# Altium PCB BOARD_2LAYER.PcbDoc (part 6 of 7)
Units mil, origin at the board's own origin, x right, y up, seen from the top; angles counter-clockwise.
Board outline 9842.52 x 9842.52 mil, 2 copper layers (Top Layer, Bottom Layer), stack 34.252 mil thick; 276 components, 129 nets, 793 pads, 303 vias.
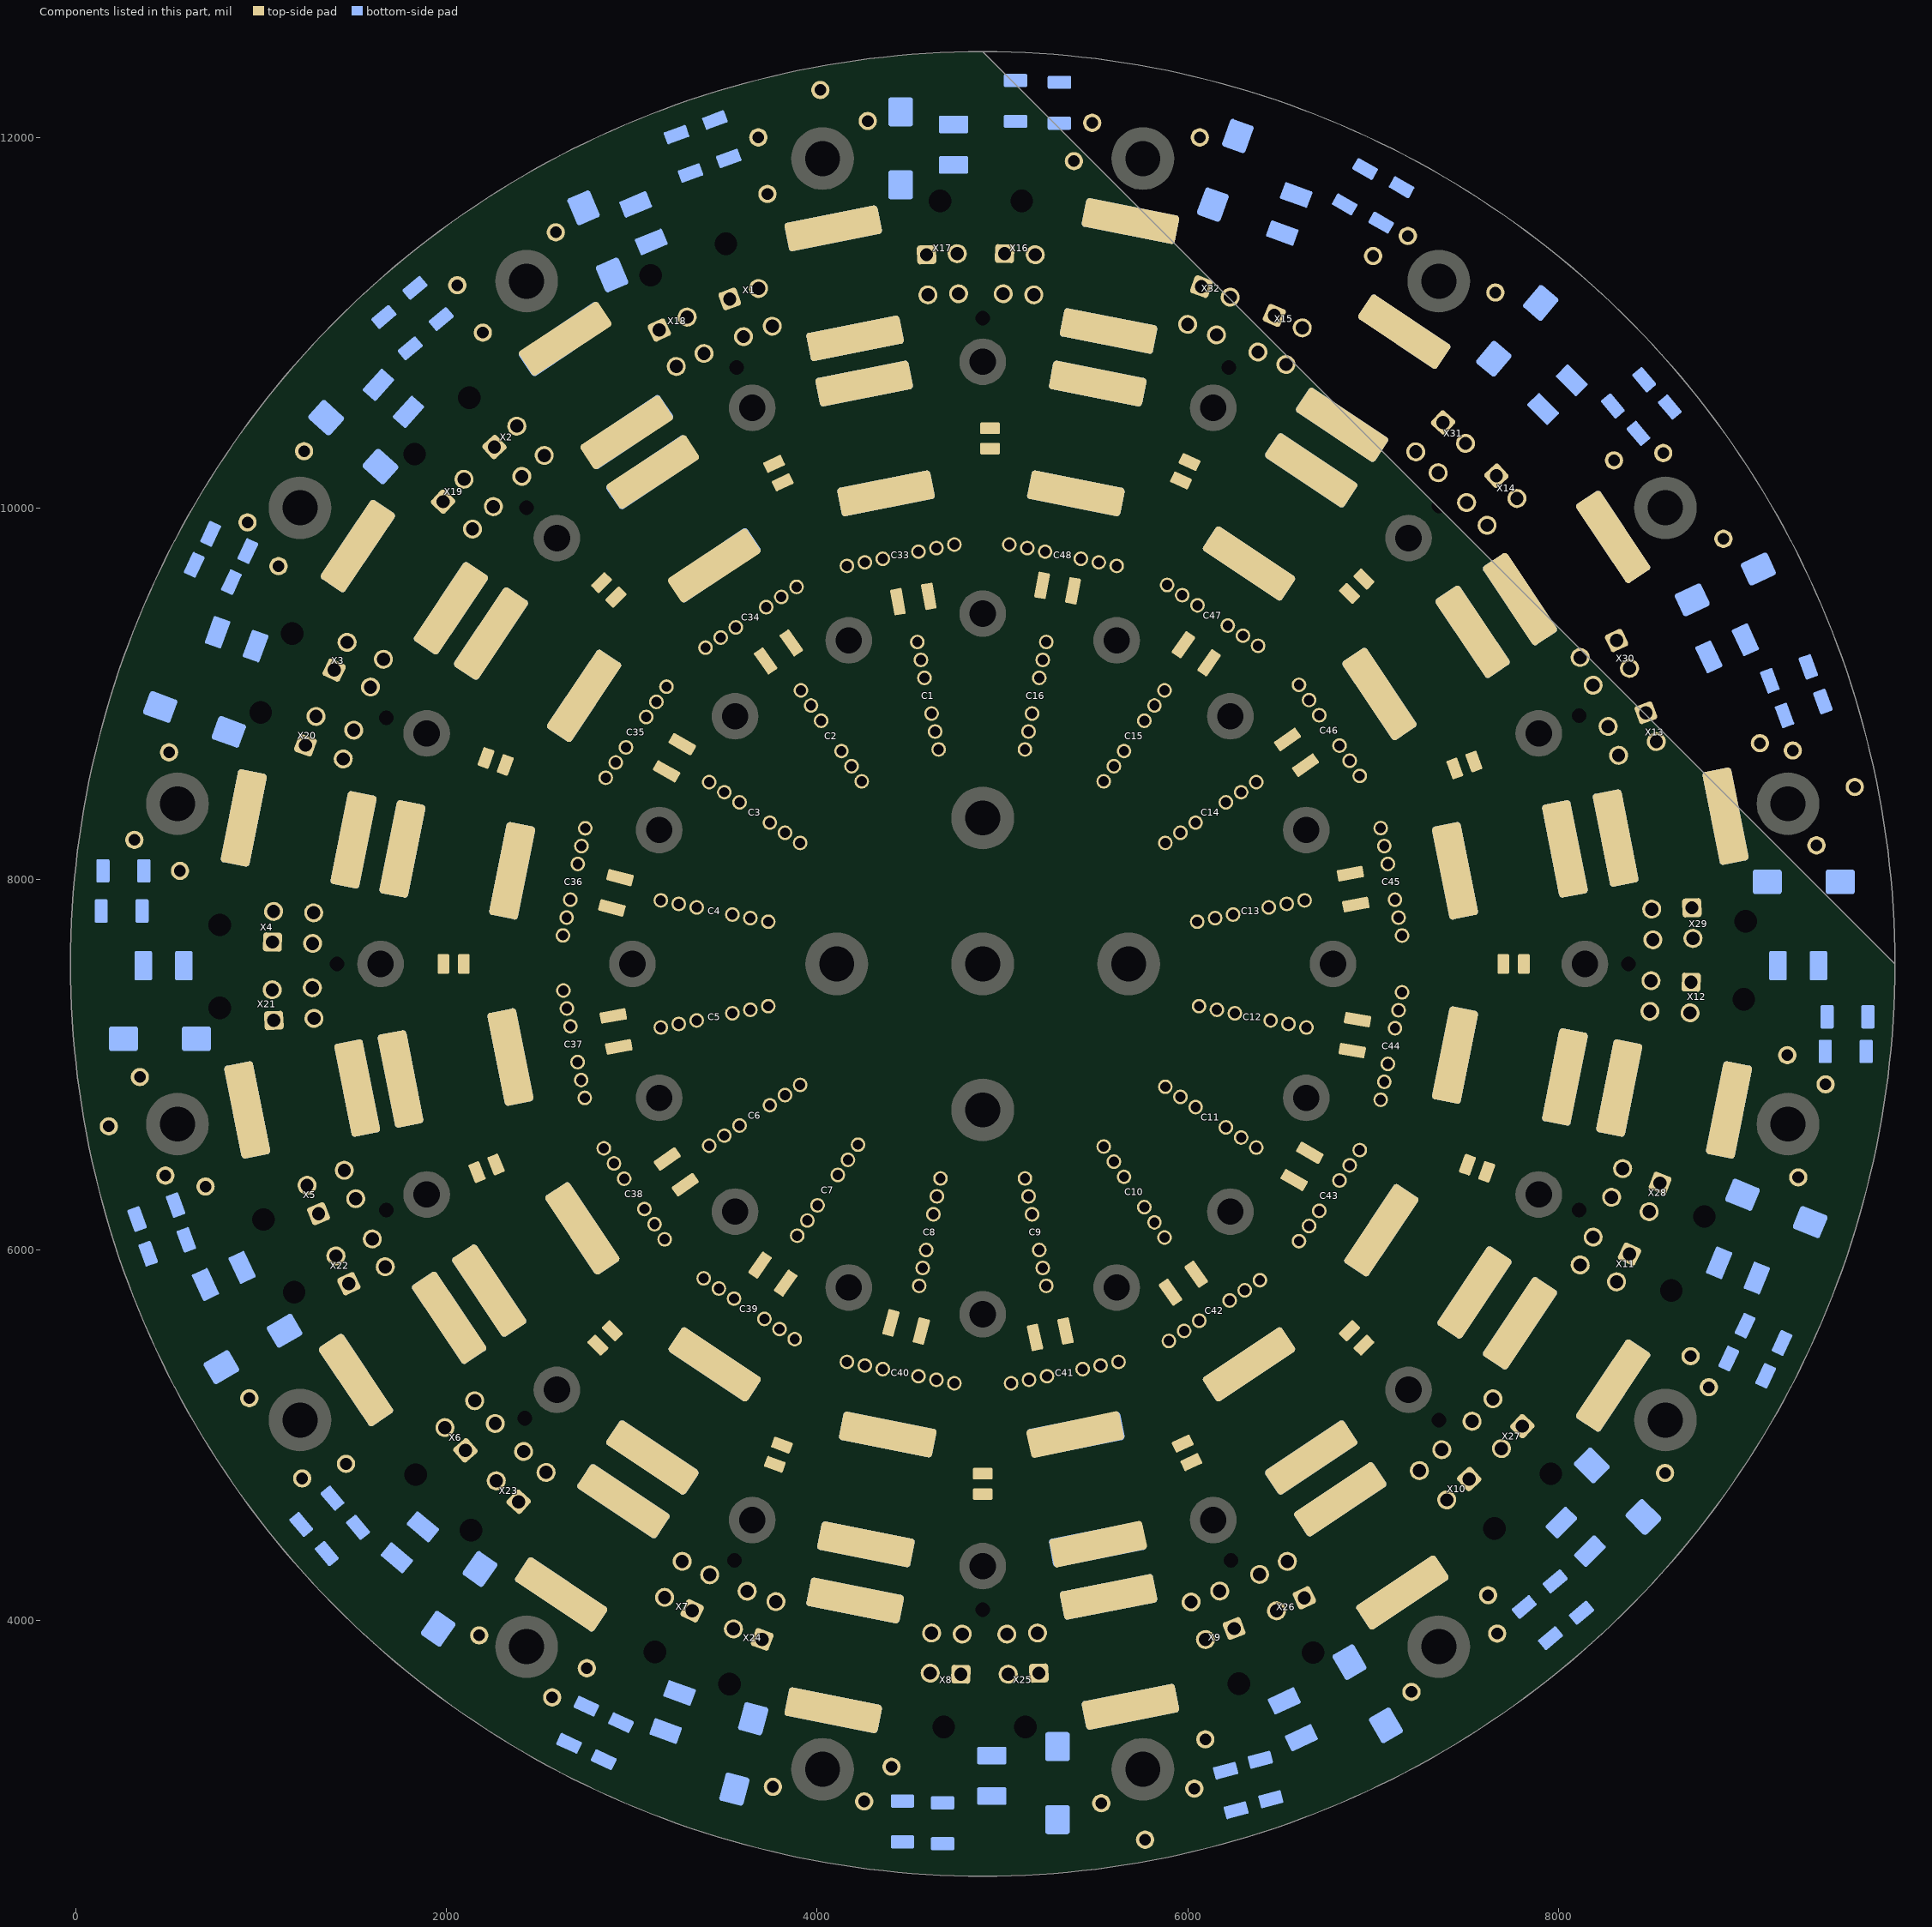
[diagram p6: the components of this part, seen from the top]

## Polygon pours and split planes (outlines as drawn) (continued)
$1N2769 on Top Layer "$1N2769_L01_P132" (solid, remove dead copper, pour order 132): 4351.23,9328.75 4413.86,9013.92 4674.26,9065.72 4611.64,9380.55
$1N5644 on Top Layer "$1N5644_L01_P128" (solid, remove dead copper, pour order 128): 5700.54,9875.58 5794.44,10347.64 5133.39,10479.14 5039.49,10007.07
$1N5613 on Top Layer "$1N5613_L01_P126" (solid, remove dead copper, pour order 126): 6530.46,9393.26 6805.29,9804.58 6245.04,10178.93 5970.21,9767.61
$1N5582 on Top Layer "$1N5582_L01_P124" (solid, remove dead copper, pour order 124): 7105.92,8639.22 7545.86,8933.18 7167.92,9498.82 6727.97,9204.85
$1N5551 on Top Layer "$1N5551_L01_P123" (solid, remove dead copper, pour order 123): 7373.14,7679.86 7902.79,7792.44 7762.81,8450.96 7233.17,8338.38
$1N5520 on Top Layer "$1N5520_L01_P121" (solid, remove dead copper, pour order 121): 7230.78,6755.51 7718.02,6658.59 7849.13,7317.74 7361.89,7414.66
$1N5489 on Top Layer "$1N5489_L01_P119" (solid, remove dead copper, pour order 119): 6739.39,5905.82 7140.31,5637.94 7513.76,6196.85 7112.84,6464.73
$1N5458 on Top Layer "$1N5458_L01_P117" (solid, remove dead copper, pour order 117): 5967.63,5318.59 6237.03,4915.41 6798.63,5290.65 6529.23,5693.84
$1N5427 on Top Layer "$1N5427_L01_P115" (solid, remove dead copper, pour order 115): 5032.48,5073.24 5138.3,4564.51 5800.8,4702.31 5694.98,5211.04
$1N5396 on Top Layer "$1N5396_L01_P113" (solid, remove dead copper, pour order 113): 4080.15,5215.65 3977.14,4697.77 4638.95,4566.13 4741.96,5084
$1N5365 on Top Layer "$1N5365_L01_P111" (solid, remove dead copper, pour order 111): 3244.82,5700.68 2959.11,5273.08 3527.94,4893 3813.65,5320.6
$1N5334 on Top Layer "$1N5334_L01_P109" (solid, remove dead copper, pour order 109): 2661.46,6473.84 2217.48,6177.18 2593.33,5614.69 3037.31,5911.34
$1N5303 on Top Layer "$1N5303_L01_P107" (solid, remove dead copper, pour order 107): 2428.46,7403.54 1907.13,7299.84 2039.44,6634.67 2560.77,6738.37
$1N5272 on Top Layer "$1N5272_L01_P105" (solid, remove dead copper, pour order 105): 2562.36,8351.15 2041.78,8454.7 1910.37,7794.04 2430.95,7690.49
$1N5241 on Top Layer "$1N5241_L01_P102" (solid, remove dead copper, pour order 102): 3047.44,9192.98 2604.82,9488.73 2230.75,8928.9 2673.37,8633.15
$1N5210 on Top Layer "$1N5210_L01_P100" (solid, remove dead copper, pour order 100): 3860,9793.26 3566.37,10241.13 2912.99,9812.76 3206.63,9364.89
$1N5645 on Top Layer "$1N5645_L01_P099" (solid, remove dead copper, pour order 99): 5779.26,10443.08 5937.96,11240.9 5340.13,11359.82 5181.44,10562
$1N5614 on Top Layer "$1N5614_L01_P098" (solid, remove dead copper, pour order 98): 6840.76,9905.6 7308.16,10605.1 6797.42,10946.37 6330.02,10246.86
$1N5583 on Top Layer "$1N5583_L01_P097" (solid, remove dead copper, pour order 97): 7577.99,9003.97 8207.64,9424.68 7871.82,9927.26 7242.18,9506.55
$1N5552 on Top Layer "$1N5552_L01_P096" (solid, remove dead copper, pour order 96): 7980.09,7841.02 8706.01,7995.31 8579.7,8589.51 7853.79,8435.21
$1N5521 on Top Layer "$1N5521_L01_P095" (solid, remove dead copper, pour order 95): 7810.04,6665.52 8602.72,6507.84 8720.58,7100.35 7927.9,7258.03
$1N5490 on Top Layer "$1N5490_L01_P094" (solid, remove dead copper, pour order 94): 7239.44,5615.33 7924.99,5157.26 8263.52,5663.91 7577.97,6121.98
$1N5459 on Top Layer "$1N5459_L01_P093" (solid, remove dead copper, pour order 93): 6309.66,4875.09 6755.98,4207.13 7260.82,4544.45 6814.5,5212.41
$1N5428 on Top Layer "$1N5428_L01_P092" (solid, remove dead copper, pour order 92): 5201.57,4489.97 5356.86,3709.27 5938.38,3824.95 5783.09,4605.64
$1N5397 on Top Layer "$1N5397_L01_P091" (solid, remove dead copper, pour order 91): 4006.93,4614.67 3844.02,3795.65 4416.85,3681.7 4579.77,4500.73
$1N5366 on Top Layer "$1N5366_L01_P090" (solid, remove dead copper, pour order 90): 2955.77,5177.05 2522.77,4529.03 3017.18,4198.67 3450.18,4846.7
$1N5335 on Top Layer "$1N5335_L01_P089" (solid, remove dead copper, pour order 89): 2180.71,6100.46 1540.3,5672.55 1873.08,5174.51 2513.49,5602.42
$1N5304 on Top Layer "$1N5304_L01_P088" (solid, remove dead copper, pour order 88): 1823.79,7233.53 1104.36,7090.43 1220.34,6507.39 1939.76,6650.5
$1N5273 on Top Layer "$1N5273_L01_P087" (solid, remove dead copper, pour order 87): 1962.39,8435.6 1223.01,8582.67 1103.65,7982.58 1843.02,7835.51
$1N5242 on Top Layer "$1N5242_L01_P086" (solid, remove dead copper, pour order 86): 2511.96,9503.02 1918.06,9899.85 1578.31,9391.37 2172.2,8994.54
$1N5211 on Top Layer "$1N5211_L01_P085" (solid, remove dead copper, pour order 85): 3434.04,10250.99 3023.75,10876.79 2523.03,10548.5 2933.32,9922.7
$1N3217 on Top Layer "$1N3217_L01_P084" (solid, remove dead copper, pour order 84): 3988.99,10497.8 3840.77,11242.93 4419.66,11358.08 4567.88,10612.95
$1N3215 on Top Layer "$1N3215_L01_P083" (solid, remove dead copper, pour order 83): 4029.2,9867.75 3931.45,10359.17 4706.85,10513.41 4804.6,10021.99
~OUT on Top Layer "~OUT_L01_P081" (solid, remove dead copper, pour order 81): 5677.91,9595.8 5369.49,9657.15 5411.57,9868.7 5719.99,9807.35
~OUT on Top Layer "~OUT_L01_P080" (solid, remove dead copper, pour order 80): 6373.7,9123.71 6114.85,9296.67 6246.22,9493.27 6505.07,9320.32
~OUT on Top Layer "~OUT_L01_P079" (solid, remove dead copper, pour order 79): 6878.01,8430.08 6705.64,8688.06 6912.25,8826.11 7084.62,8568.13
~OUT on Top Layer "~OUT_L01_P078" (solid, remove dead copper, pour order 78): 7060.96,7601.52 7001.42,7900.83 7241.75,7948.64 7301.29,7649.32
~OUT on Top Layer "~OUT_L01_P077" (solid, remove dead copper, pour order 77): 6931.57,6753.67 6993.37,7064.36 7230.69,7017.15 7168.89,6706.47
~OUT on Top Layer "~OUT_L01_P076" (solid, remove dead copper, pour order 76): 6469.82,6040.7 6641.88,6298.2 6826.71,6174.7 6654.65,5917.2
~OUT on Top Layer "~OUT_L01_P075" (solid, remove dead copper, pour order 75): 5772.35,5558.63 6032.11,5732.19 6164.08,5534.68 5904.32,5361.12
~OUT on Top Layer "~OUT_L01_P074" (solid, remove dead copper, pour order 74): 4944.47,5379.51 5247.24,5439.74 5297.23,5188.41 4994.46,5128.19
~OUT on Top Layer "~OUT_L01_P073" (solid, remove dead copper, pour order 73): 4113.01,5557.17 4419.17,5496.27 4365.33,5225.61 4059.17,5286.51
~OUT on Top Layer "~OUT_L01_P072" (solid, remove dead copper, pour order 72): 3387.22,5990.25 3650.6,5814.27 3502.24,5592.24 3238.86,5768.22
~OUT on Top Layer "~OUT_L01_P071" (solid, remove dead copper, pour order 71): 2931.28,6694.41 3105.77,6433.28 2876.91,6280.36 2702.43,6541.49
~OUT on Top Layer "~OUT_L01_P070" (solid, remove dead copper, pour order 70): 2749.02,7496.97 2808.41,7198.43 2545.35,7146.1 2485.97,7444.64
~OUT on Top Layer "~OUT_L01_P069" (solid, remove dead copper, pour order 69): 2881.98,8330.17 2817.75,8021.37 2580.65,8070.68 2644.88,8379.48
~OUT on Top Layer "~OUT_L01_P055" (solid, remove dead copper, pour order 55): 1151.51,8771.79 885.39,8824.73 726.71,8026.98 992.83,7974.04
~OUT on Top Layer "~OUT_L01_P054" (solid, remove dead copper, pour order 54): 3350.22,9021.12 3175.45,8759.57 2960.72,8903.05 3135.49,9164.6
~OUT on Top Layer "~OUT_L01_P050" (solid, remove dead copper, pour order 50): 1898.04,10136.89 1692.77,10274.05 1232.3,9584.9 1437.57,9447.74
~OUT on Top Layer "~OUT_L01_P049" (solid, remove dead copper, pour order 49): 4036.08,9504.24 3774.01,9329.13 3630.81,9543.45 3892.88,9718.56
~OUT on Top Layer "~OUT_L01_P048" (solid, remove dead copper, pour order 48): 4496.79,9875.81 4549.04,9613.13 4846.48,9672.3 4794.23,9934.98
~OUT on Top Layer "~OUT_L01_P047" (solid, remove dead copper, pour order 47): 3777.12,11331.48 3730.96,11563.51 4557.87,11727.99 4604.02,11495.96
~OUT on Top Layer "~OUT_L01_P046" (solid, remove dead copper, pour order 46): 3090.63,11082.34 2960.98,11280.09 2291.33,10841.05 2420.98,10643.3
~OUT on Top Layer "~OUT_L01_P044" (solid, remove dead copper, pour order 44): 9776.86,7543.31 ccw(c4894.97,7543.31) 4894.97,12425.2 ccw(c4894.97,7543.31) 13.08,7543.31 ccw(c4894.97,7543.31) 4894.97,2661.42 ccw(c4894.97,7543.31) 9776.86,7543.31 ccw(c4894.97,7543.31)
~OUT on Top Layer "~OUT_L01_P042" (solid, remove dead copper, pour order 42): 4889.06,8588.65 ccw(c4893,7543.31) 4494.87,8509.87 4353.31,8860.24 cw(c4893,7543.31) 4889.06,8966.53 4889.06,8588.65 ccw(c4893,7543.31)
~OUT on Top Layer "~OUT_L01_P040" (solid, remove dead copper, pour order 40): 4483.94,8505.3 ccw(c4893,7543.31) 4156.09,8284.74 3888.89,8551.94 cw(c4893,7543.31) 4342.36,8855.7 4483.94,8505.3 ccw(c4893,7543.31)
~OUT on Top Layer "~OUT_L01_P038" (solid, remove dead copper, pour order 38): 4151.29,8279.94 ccw(c4893,7543.31) 3930.82,7951.93 3582.99,8099.58 cw(c4893,7543.31) 3884.09,8547.14 4151.29,8279.94 ccw(c4893,7543.31)
~OUT on Top Layer "~OUT_L01_P036" (solid, remove dead copper, pour order 36): 3927.65,7944.38 ccw(c4893,7543.31) 3847.66,7547.24 3469.78,7547.24 cw(c4893,7543.31) 3579.81,8092.04 3927.65,7944.38 ccw(c4893,7543.31)
~OUT on Top Layer "~OUT_L01_P034" (solid, remove dead copper, pour order 34): 3924.33,7150.31 3575.21,7005.7 cw(c4893,7543.31) 3469.78,7537.4 3847.67,7537.4 ccw(c4893,7543.31)
~OUT on Top Layer "~OUT_L01_P032" (solid, remove dead copper, pour order 32): 4141.83,6816.33 3874.6,6549.11 cw(c4893,7543.31) 3577.75,6999.53 3926.86,7144.14 ccw(c4893,7543.31)
~OUT on Top Layer "~OUT_L01_P030" (solid, remove dead copper, pour order 30): 4483.08,6581.68 4338.47,6232.55 cw(c4893,7543.31) 3878.37,6545.26 4145.58,6812.47 ccw(c4893,7543.31)
~OUT on Top Layer "~OUT_L01_P028" (solid, remove dead copper, pour order 28): 4887.09,6120.09 cw(c4893,7543.31) 4344.61,6229.97 4489.22,6579.09 ccw(c4893,7543.31) 4887.09,6497.97 4887.09,6120.09 cw(c4893,7543.31)
~OUT on Top Layer "~OUT_L01_P026" (solid, remove dead copper, pour order 26): 5429.7,6225.15 cw(c4893,7543.31) 4896.94,6120.08 4896.94,6497.96 ccw(c4893,7543.31) 5288.15,6575.52 5429.7,6225.15 cw(c4893,7543.31)
~OUT on Top Layer "~OUT_L01_P024" (solid, remove dead copper, pour order 24): 5896.84,6534.4 cw(c4893,7543.31) 5440.66,6229.67 5299.09,6580.06 ccw(c4893,7543.31) 5629.63,6801.6 5896.84,6534.4 cw(c4893,7543.31)
~OUT on Top Layer "~OUT_L01_P022" (solid, remove dead copper, pour order 22): 6208.27,6999.56 cw(c4893,7543.31) 5901.63,6539.19 5634.43,6806.39 ccw(c4893,7543.31) 5860.4,7147.22 6208.27,6999.56 cw(c4893,7543.31)
~OUT on Top Layer "~OUT_L01_P020" (solid, remove dead copper, pour order 20): 6316.22,7539.37 cw(c4893,7543.31) 6211.37,7007.14 5863.48,7154.81 ccw(c4893,7543.31) 5938.34,7539.37 6316.22,7539.37 cw(c4893,7543.31)
~OUT on Top Layer "~OUT_L01_P018" (solid, remove dead copper, pour order 18): 6316.22,7549.21 5938.33,7549.21 ccw(c4893,7543.31) 5858.82,7943.25 6207.93,8087.86 cw(c4893,7543.31)
~OUT on Top Layer "~OUT_L01_P016" (solid, remove dead copper, pour order 16): 6205.36,8094.01 5856.25,7949.4 ccw(c4893,7543.31) 5623.84,8290.73 5891.05,8557.94 cw(c4893,7543.31)
~OUT on Top Layer "~OUT_L01_P014" (solid, remove dead copper, pour order 14): 5887.2,8561.71 5619.97,8294.48 ccw(c4893,7543.31) 5290.15,8510.27 5434.76,8859.39 cw(c4893,7543.31)
~OUT on Top Layer "~OUT_L01_P012" (solid, remove dead copper, pour order 12): 5428.59,8861.91 5283.98,8512.79 ccw(c4893,7543.31) 4898.91,8588.64 4898.91,8966.52 cw(c4893,7543.31)
~OUT on Top Layer "~OUT_L01_P011" (solid, remove dead copper, pour order 11): 967.22,7258.67 718.28,7209.15 878.17,6405.33 1127.11,6454.84
~OUT on Top Layer "~OUT_L01_P010" (solid, remove dead copper, pour order 10): 1349.9,5784.37 1144.8,5647.32 1607.69,4954.56 1812.79,5091.61
~OUT on Top Layer "~OUT_L01_P009" (solid, remove dead copper, pour order 9): 2271.89,4554.43 2130.1,4342.22 2841.03,3867.2 2982.82,4079.4
~OUT on Top Layer "~OUT_L01_P008" (solid, remove dead copper, pour order 8): 3634.25,3755.08 3585.01,3507.54 4378.96,3349.61 4428.2,3597.15
~OUT on Top Layer "~OUT_L01_P007" (solid, remove dead copper, pour order 7): 5177.64,3599.61 5229.84,3337.21 6001.44,3490.69 5949.25,3753.09
~OUT on Top Layer "~OUT_L01_P006" (solid, remove dead copper, pour order 6): 6657.48,4014.21 6823.24,3766.14 7513.3,4227.23 7347.54,4475.3
~OUT on Top Layer "~OUT_L01_P005" (solid, remove dead copper, pour order 5): 7881.28,4947.59 8081.1,4814.08 8544.01,5506.87 8344.19,5640.39
~OUT on Top Layer "~OUT_L01_P004" (solid, remove dead copper, pour order 4): 8655.34,6298.03 8926.98,6243.99 9085.65,7041.67 8814.01,7095.7
~OUT on Top Layer "~OUT_L01_P003" (solid, remove dead copper, pour order 3): 8852.12,7834.03 9107.55,7884.83 8946.38,8695.06 8690.95,8644.25
~OUT on Top Layer "~OUT_L01_P002" (solid, remove dead copper, pour order 2): 8409.7,9306.83 8666.36,9478.32 8182.84,10201.95 7926.19,10030.46
~OUT on Top Layer "~OUT_L01_P001" (solid, remove dead copper, pour order 1): 7501.9,10578.91 7636.48,10780.32 6952.32,11237.47 6817.74,11036.06
~OUT on Top Layer "~OUT_L01_P000" (solid, remove dead copper, pour order 0): 6133.35,11295.51 6186.49,11562.67 5374.78,11724.13 5321.63,11456.97
$1N5643 on Bottom Layer "$1N5643_L02_P225" (solid, remove dead copper, pour order 225): 5777.51,10441.06 5939.83,11257.06 5344.65,11375.45 5182.34,10559.45
$1N5612 on Bottom Layer "$1N5612_L02_P224" (solid, remove dead copper, pour order 224): 6826.84,9897.86 7262.38,10549.69 6756.19,10887.92 6320.65,10236.08
$1N5581 on Bottom Layer "$1N5581_L02_P223" (solid, remove dead copper, pour order 223): 7601.03,9005.92 8273.83,9455.47 7929.53,9970.75 7256.73,9521.2
$1N5550 on Bottom Layer "$1N5550_L02_P222" (solid, remove dead copper, pour order 222): 7959.99,7838.95 8698.26,7985.8 8577.4,8593.44 7839.12,8446.59
$1N5519 on Bottom Layer "$1N5519_L02_P221" (solid, remove dead copper, pour order 221): 7827.33,6673.77 8600.07,6520.06 8717.32,7109.51 7944.58,7263.21
$1N5488 on Bottom Layer "$1N5488_L02_P220" (solid, remove dead copper, pour order 220): 7243.29,5618.11 7945.18,5149.13 8280.69,5651.25 7578.8,6120.23
$1N5457 on Bottom Layer "$1N5457_L02_P219" (solid, remove dead copper, pour order 219): 6355.44,4827.47 6771.28,4233.59 7266.09,4580.06 6850.25,5173.94
$1N5426 on Bottom Layer "$1N5426_L02_P218" (solid, remove dead copper, pour order 218): 5187.25,4531.28 5350.61,3710.03 5938.6,3826.99 5775.24,4648.24
$1N5395 on Bottom Layer "$1N5395_L02_P217" (solid, remove dead copper, pour order 217): 4000.63,4621.42 3842.93,3828.61 4435.09,3710.82 4592.79,4503.63
$1N5364 on Bottom Layer "$1N5364_L02_P216" (solid, remove dead copper, pour order 216): 2965.58,5181.67 2517.75,4511.44 3008.03,4183.85 3455.86,4854.08
$1N5333 on Bottom Layer "$1N5333_L02_P215" (solid, remove dead copper, pour order 215): 2187.72,6094.01 1532.25,5656.04 1861.09,5163.9 2516.56,5601.87
$1N5302 on Bottom Layer "$1N5302_L02_P214" (solid, remove dead copper, pour order 214): 1835.34,7237.7 1103.72,7092.17 1219.55,6509.89 1951.16,6655.42
$1N5271 on Bottom Layer "$1N5271_L02_P213" (solid, remove dead copper, pour order 213): 1943.2,8424.12 1237.48,8564.5 1121.66,7982.21 1827.38,7841.83
$1N5240 on Bottom Layer "$1N5240_L02_P212" (solid, remove dead copper, pour order 212): 2520.67,9494.39 1915.9,9898.48 1576.45,9390.47 2181.22,8986.37
$1N5209 on Bottom Layer "$1N5209_L02_P211" (solid, remove dead copper, pour order 211): 3448.78,10245.07 3055.23,10845.33 2541.12,10508.27 2934.68,9908
D_CH-16 on Bottom Layer "D_CH-16_L02_P210" (solid, remove dead copper, pour order 210): 5975.22,11349.14 6023.73,11593.05 5207.48,11755.42 5158.96,11511.51
D_CH-15 on Bottom Layer "D_CH-15_L02_P209" (solid, remove dead copper, pour order 209): 7353.51,10620.98 7512.63,10859.12 6801.22,11334.47 6642.1,11096.33
D_CH-14 on Bottom Layer "D_CH-14_L02_P208" (solid, remove dead copper, pour order 208): 8363.48,9493.9 8535.27,9608.69 8071.77,10302.38 7899.97,10187.59
D_CH-13 on Bottom Layer "D_CH-13_L02_P207" (solid, remove dead copper, pour order 207): 8794.6,7977.09 9068.17,8031.51 8903.54,8859.17 8629.97,8804.75
D_CH-12 on Bottom Layer "D_CH-12_L02_P206" (solid, remove dead copper, pour order 206): 8685.35,6503.26 8973.44,6445.95 9132.04,7243.3 8843.95,7300.61
D_CH-11 on Bottom Layer "D_CH-11_L02_P205" (solid, remove dead copper, pour order 205): 7901.07,4940.93 8110.89,4800.73 8671.47,5639.69 8461.65,5779.89
D_CH-10 on Bottom Layer "D_CH-10_L02_P204" (solid, remove dead copper, pour order 204): 6775.19,4115.14 6951.54,3851.22 7667.41,4329.55 7491.07,4593.47
D_CH-9 on Bottom Layer "D_CH-9_L02_P203" (solid, remove dead copper, pour order 203): 5326.26,3624.75 5379.56,3356.77 6208.75,3521.71 6155.45,3789.68
D_CH-8 on Bottom Layer "D_CH-8_L02_P202" (solid, remove dead copper, pour order 202): 3786.62,3734.68 3736.01,3480.24 4574.96,3313.37 4625.57,3567.8
D_CH-7 on Bottom Layer "D_CH-7_L02_P201" (solid, remove dead copper, pour order 201): 2408.02,4441.9 2277.12,4246 2989.9,3769.74 3120.79,3965.64
D_CH-6 on Bottom Layer "D_CH-6_L02_P200" (solid, remove dead copper, pour order 200): 1428.81,5644.71 1232.73,5513.69 1705.29,4806.44 1901.38,4937.46
D_CH-5 on Bottom Layer "D_CH-5_L02_P199" (solid, remove dead copper, pour order 199): 994.34,7068.89 739.75,7018.25 897.38,6225.79 1151.96,6276.43
D_CH-4 on Bottom Layer "D_CH-4_L02_P198" (solid, remove dead copper, pour order 198): 1108.76,8631.9 866.84,8680.02 704.54,7864.11 946.47,7815.98
D_CH-3 on Bottom Layer "D_CH-3_L02_P197" (solid, remove dead copper, pour order 197): 1810.76,10007.41 1616.01,10137.54 1154.91,9447.46 1349.66,9317.33
D_CH-2 on Bottom Layer "D_CH-2_L02_P196" (solid, remove dead copper, pour order 196): 2977.02,11011.3 2860.14,11189.58 2147.98,10722.67 2264.86,10544.39
D_CH-1 on Bottom Layer "D_CH-1_L02_P195" (solid, remove dead copper, pour order 195): 3619.85,11312.37 3575.95,11533.07 4390.01,11694.99 4433.91,11474.3
$1N3213 on Bottom Layer "$1N3213_L02_P194" (solid, remove dead copper, pour order 194): 3986.72,10495.38 3839.78,11234.06 4438.74,11353.2 4585.67,10614.52
$1N6128 on Bottom Layer "$1N6128_L02_P192" (solid, remove dead copper, pour order 192): 5236.53,9565.18 4921.99,9627.74 4987.2,9955.57 5301.74,9893
$1N6128 on Bottom Layer "$1N6128_L02_P191" (solid, remove dead copper, pour order 191): 4996.58,9090.55 5067.73,9448.23 5453.87,9371.42 5382.72,9013.74
$1N6121 on Bottom Layer "$1N6121_L02_P188" (solid, remove dead copper, pour order 188): 5976.76,9292.24 5715.64,9466.72 5900.4,9743.23 6161.52,9568.76
$1N6121 on Bottom Layer "$1N6121_L02_P187" (solid, remove dead copper, pour order 187): 5581.21,8938.41 5797.52,9262.14 6124.87,9043.41 5908.56,8719.68
$1N6115 on Bottom Layer "$1N6115_L02_P184" (solid, remove dead copper, pour order 184): 6568.87,8739.57 6391.04,9005.71 6661.65,9186.53 6839.48,8920.38
$1N6115 on Bottom Layer "$1N6115_L02_P183" (solid, remove dead copper, pour order 183): 6061.4,8554.9 6380.67,8768.23 6599.4,8440.88 6280.13,8227.55
$1N6109 on Bottom Layer "$1N6109_L02_P180" (solid, remove dead copper, pour order 180): 6893.6,8007.14 6833.16,8310.99 7149.61,8373.94 7210.05,8070.09
$1N6109 on Bottom Layer "$1N6109_L02_P179" (solid, remove dead copper, pour order 179): 6355.48,8031.83 6700.6,8100.48 6777.41,7714.34 6432.29,7645.69
$1N5983 on Bottom Layer "$1N5983_L02_P176" (solid, remove dead copper, pour order 176): 6918.81,7197.82 6980.01,7505.51 7317.3,7438.42 7256.1,7130.73
$1N5983 on Bottom Layer "$1N5983_L02_P175" (solid, remove dead copper, pour order 175): 6418.79,7403.56 6861.37,7309.49 6797.2,7007.62 6354.63,7101.69
$1N5976 on Bottom Layer "$1N5976_L02_P172" (solid, remove dead copper, pour order 172): 6635.31,6453.57 6807,6710.53 7070.35,6534.56 6898.66,6277.61
$1N5976 on Bottom Layer "$1N5976_L02_P171" (solid, remove dead copper, pour order 171): 6279.6,6848.32 6582.03,6646.25 6363.3,6318.9 6060.87,6520.97
$1N5970 on Bottom Layer "$1N5970_L02_P168" (solid, remove dead copper, pour order 168): 6084.55,5871.48 6340.3,6042.36 6517.78,5776.74 6262.03,5605.86
$1N5970 on Bottom Layer "$1N5970_L02_P167" (solid, remove dead copper, pour order 167): 5905.65,6376.22 6119.86,6055.63 5792.51,5836.9 5578.3,6157.49
$1N5964 on Bottom Layer "$1N5964_L02_P164" (solid, remove dead copper, pour order 164): 5360.11,5544.15 5656.75,5603.15 5714.88,5310.92 5418.24,5251.92
$1N5964 on Bottom Layer "$1N5964_L02_P163" (solid, remove dead copper, pour order 163): 5382.93,6076.08 5459.35,5691.88 5073.22,5615.07 4996.79,5999.27
$1N5838 on Bottom Layer "$1N5838_L02_P160" (solid, remove dead copper, pour order 160): 4552.99,5519.18 4851.59,5459.78 4788.42,5142.19 4489.82,5201.59
$1N5838 on Bottom Layer "$1N5838_L02_P159" (solid, remove dead copper, pour order 159): 4787.13,5984.76 4712.59,5610 4323.81,5687.33 4398.35,6062.09
$1N5831 on Bottom Layer "$1N5831_L02_P156" (solid, remove dead copper, pour order 156): 3797.61,5809.33 4050.97,5640.04 3880.18,5384.43 3626.81,5553.72
$1N5831 on Bottom Layer "$1N5831_L02_P154" (solid, remove dead copper, pour order 154): 4183.27,6157.38 3980.87,5854.47 3740.24,6015.26 3942.64,6318.17
$1N5825 on Bottom Layer "$1N5825_L02_P152" (solid, remove dead copper, pour order 152): 3208.98,6365.2 3386.2,6099.96 3122.4,5923.7 2945.18,6188.93
$1N5825 on Bottom Layer "$1N5825_L02_P151" (solid, remove dead copper, pour order 151): 3707.02,6524.52 3417.3,6330.94 3202.81,6651.93 3492.54,6845.52
$1N5819 on Bottom Layer "$1N5819_L02_P148" (solid, remove dead copper, pour order 148): 2894.65,7085.86 2955.77,6778.56 2638.55,6715.46 2577.42,7022.76
$1N5819 on Bottom Layer "$1N5819_L02_P147" (solid, remove dead copper, pour order 147): 3414.22,7050 3058.43,6979.23 2981.62,7365.37 3337.41,7436.14
$1N5781 on Bottom Layer "$1N5781_L02_P144" (solid, remove dead copper, pour order 144): 2864.92,7875.17 2804.33,7583.91 2497.03,7647.83 2557.61,7939.08
$1N5781 on Bottom Layer "$1N5781_L02_P142" (solid, remove dead copper, pour order 142): 3333.75,7653.96 2959.06,7728.49 3034.59,8108.2 3409.28,8033.67
$1N5742 on Bottom Layer "$1N5742_L02_P140" (solid, remove dead copper, pour order 140): 3177.17,8671.88 2978.45,8374.47 2729.2,8541.01 2927.93,8838.42
$1N5742 on Bottom Layer "$1N5742_L02_P138" (solid, remove dead copper, pour order 138): 3708.61,8563.61 3494.43,8243.07 3145.72,8476.07 3359.9,8796.61
$1N5703 on Bottom Layer "$1N5703_L02_P137" (solid, remove dead copper, pour order 137): 3725.35,9230.37 3441.94,9041 3259.01,9314.78 3542.42,9504.15
$1N5703 on Bottom Layer "$1N5703_L02_P135" (solid, remove dead copper, pour order 135): 4205.39,8931.52 3878.04,8712.79 3643.2,9064.25 3970.55,9282.98
$1N2769 on Bottom Layer "$1N2769_L02_P131" (solid, remove dead copper, pour order 131): 4079.23,9778.5 4136.9,9488.55 4430.94,9547.04 4373.26,9836.99
$1N2769 on Bottom Layer "$1N2769_L02_P130" (solid, remove dead copper, pour order 130): 4316.64,9405.72 4395.31,9010.23 4778.03,9086.36 4699.37,9481.85
$1N5644 on Bottom Layer "$1N5644_L02_P129" (solid, remove dead copper, pour order 129): 5696.82,9875.8 5789.82,10343.34 5129.55,10474.68 5036.55,10007.14
$1N5613 on Bottom Layer "$1N5613_L02_P127" (solid, remove dead copper, pour order 127): 6526.87,9392.18 6797.75,9797.59 6237.04,10172.24 5966.16,9766.84
$1N5582 on Bottom Layer "$1N5582_L02_P125" (solid, remove dead copper, pour order 125): 7103.07,8644.5 7542.1,8937.85 7168.37,9497.17 6729.35,9203.82
$1N5551 on Bottom Layer "$1N5551_L02_P122" (solid, remove dead copper, pour order 122): 7376.67,7680.61 7864.6,7784.32 7724.63,8442.84 7236.7,8339.13
$1N5520 on Bottom Layer "$1N5520_L02_P120" (solid, remove dead copper, pour order 120): 7228.71,6751.02 7714.43,6654.41 7846.44,7318.1 7360.73,7414.71
$1N5489 on Bottom Layer "$1N5489_L02_P118" (solid, remove dead copper, pour order 118): 6737.53,5902.93 7154.76,5624.15 7531.22,6187.57 7114,6466.35
$1N5458 on Bottom Layer "$1N5458_L02_P116" (solid, remove dead copper, pour order 116): 5965.56,5321.14 6242.23,4907.07 6805.16,5283.21 6528.49,5697.28
$1N5427 on Bottom Layer "$1N5427_L02_P114" (solid, remove dead copper, pour order 114): 5035.94,5073.8 5136.11,4592.2 5797.12,4729.69 5696.95,5211.29
$1N5396 on Bottom Layer "$1N5396_L02_P112" (solid, remove dead copper, pour order 112): 4078.77,5213.94 3976.65,4700.56 4641.1,4568.39 4743.22,5081.77
$1N5365 on Bottom Layer "$1N5365_L02_P110" (solid, remove dead copper, pour order 110): 3255.63,5701.35 2969.31,5272.84 3527.29,4900 3813.62,5328.52
$1N5334 on Bottom Layer "$1N5334_L02_P108" (solid, remove dead copper, pour order 108): 2659.91,6479.27 2219.95,6185.3 2598.23,5619.16 3038.19,5913.13
$1N5303 on Bottom Layer "$1N5303_L02_P106" (solid, remove dead copper, pour order 106): 2427.16,7400.42 1901.3,7295.82 2032.34,6637.02 2558.2,6741.62
$1N5272 on Bottom Layer "$1N5272_L02_P104" (solid, remove dead copper, pour order 104): 2557.61,8349.02 2027.2,8454.53 1896.02,7795 2426.42,7689.5
$1N5241 on Bottom Layer "$1N5241_L02_P103" (solid, remove dead copper, pour order 103): 3050.42,9191.44 2634.49,9469.36 2258.95,8907.33 2674.88,8629.41
$1N5210 on Bottom Layer "$1N5210_L02_P101" (solid, remove dead copper, pour order 101): 3802.37,9760.38 3523.25,10186.11 2922.3,9792.11 3201.42,9366.38
$1N3215 on Bottom Layer "$1N3215_L02_P082" (solid, remove dead copper, pour order 82): 4024.9,9871.62 3927.9,10359.25 4703.69,10513.56 4800.69,10025.93
~OUT on Bottom Layer "~OUT_L02_P068" (solid, remove dead copper, pour order 68): 5654.02,9481.66 5346.74,9542.78 5411.57,9868.7 5718.85,9807.57
~OUT on Bottom Layer "~OUT_L02_P067" (solid, remove dead copper, pour order 67): 6333.64,9053.93 6070.26,9229.92 6246.22,9493.27 6509.61,9317.28
~OUT on Bottom Layer "~OUT_L02_P066" (solid, remove dead copper, pour order 66): 6808.41,8378.98 6633.92,8640.13 6912.25,8826.11 7086.74,8564.95
~OUT on Bottom Layer "~OUT_L02_P065" (solid, remove dead copper, pour order 65): 6977.79,7576.31 6916.6,7883.96 7241.75,7948.64 7302.95,7640.98
~OUT on Bottom Layer "~OUT_L02_P064" (solid, remove dead copper, pour order 64): 6833.18,6769.7 6895.66,7083.79 7230.69,7017.15 7168.21,6703.06
~OUT on Bottom Layer "~OUT_L02_P063" (solid, remove dead copper, pour order 63): 6393.58,6093.61 6564.73,6349.75 6826.71,6174.7 6655.56,5918.56
~OUT on Bottom Layer "~OUT_L02_P062" (solid, remove dead copper, pour order 62): 5724.73,5627.93 5984.04,5801.2 6162.12,5534.68 5902.81,5361.42
~OUT on Bottom Layer "~OUT_L02_P061" (solid, remove dead copper, pour order 61): 4930.47,5457.82 5231.73,5517.74 5291.66,5216.44 4990.4,5156.51
~OUT on Bottom Layer "~OUT_L02_P060" (solid, remove dead copper, pour order 60): 4126.74,5602.45 4428.36,5542.46 4365.33,5225.61 4063.71,5285.61
~OUT on Bottom Layer "~OUT_L02_P059" (solid, remove dead copper, pour order 59): 3430.44,6055.91 3695.17,5879.02 3523.77,5622.5 3259.04,5799.39
~OUT on Bottom Layer "~OUT_L02_P058" (solid, remove dead copper, pour order 58): 2967.6,6724.58 3144.81,6459.37 2876.91,6280.36 2699.7,6545.57
~OUT on Bottom Layer "~OUT_L02_P057" (solid, remove dead copper, pour order 57): 2809.08,7509.72 2867.86,7214.19 2545.35,7150.04 2486.57,7445.57
~OUT on Bottom Layer "~OUT_L02_P056" (solid, remove dead copper, pour order 56): 2957.54,8312.89 2893.62,8005.59 2580.65,8070.68 2644.57,8377.99
~OUT on Bottom Layer "~OUT_L02_P053" (solid, remove dead copper, pour order 53): 3394.39,8990.94 3223.88,8735.75 2975.55,8901.67 3146.07,9156.87
~OUT on Bottom Layer "~OUT_L02_P052" (solid, remove dead copper, pour order 52): 4061.87,9457.76 3807.52,9287.81 3627.91,9556.6 3882.27,9726.55
~OUT on Bottom Layer "~OUT_L02_P051" (solid, remove dead copper, pour order 51): 4500.17,9856.81 4557.85,9566.86 4846.59,9624.29 4788.91,9914.24
~OUT on Bottom Layer "~OUT_L02_P045" (solid, remove dead copper, pour order 45): 9774.89,7543.31 ccw(c4893,7543.31) 4893,12425.2 ccw(c4893,7543.31) 11.11,7543.31 ccw(c4893,7543.31) 4893,2661.42 ccw(c4893,7543.31) 9774.89,7543.31 ccw(c4893,7543.31)
~OUT on Bottom Layer "~OUT_L02_P043" (solid, remove dead copper, pour order 43): 4889.06,8588.65 ccw(c4893,7543.31) 4494.87,8509.87 4353.31,8860.24 cw(c4893,7543.31) 4889.06,8966.53 4889.06,8588.65 ccw(c4893,7543.31)
~OUT on Bottom Layer "~OUT_L02_P041" (solid, remove dead copper, pour order 41): 4483.94,8505.3 ccw(c4893,7543.31) 4156.09,8284.74 3888.89,8551.94 cw(c4893,7543.31) 4342.36,8855.7 4483.94,8505.3 ccw(c4893,7543.31)
~OUT on Bottom Layer "~OUT_L02_P039" (solid, remove dead copper, pour order 39): 4151.29,8279.94 ccw(c4893,7543.31) 3930.82,7951.93 3582.99,8099.58 cw(c4893,7543.31) 3884.09,8547.14 4151.29,8279.94 ccw(c4893,7543.31)
~OUT on Bottom Layer "~OUT_L02_P037" (solid, remove dead copper, pour order 37): 3927.65,7944.38 ccw(c4893,7543.31) 3847.66,7547.24 3469.78,7547.24 cw(c4893,7543.31) 3579.81,8092.04 3927.65,7944.38 ccw(c4893,7543.31)
~OUT on Bottom Layer "~OUT_L02_P035" (solid, remove dead copper, pour order 35): 3924.33,7150.31 3575.21,7005.7 cw(c4893,7543.31) 3469.78,7537.4 3847.67,7537.4 ccw(c4893,7543.31)
~OUT on Bottom Layer "~OUT_L02_P033" (solid, remove dead copper, pour order 33): 4141.83,6816.33 3874.6,6549.11 cw(c4893,7543.31) 3577.75,6999.53 3926.86,7144.14 ccw(c4893,7543.31)
~OUT on Bottom Layer "~OUT_L02_P031" (solid, remove dead copper, pour order 31): 4483.08,6581.68 4338.47,6232.55 cw(c4893,7543.31) 3878.37,6545.26 4145.58,6812.47 ccw(c4893,7543.31)
~OUT on Bottom Layer "~OUT_L02_P029" (solid, remove dead copper, pour order 29): 4887.09,6120.09 cw(c4893,7543.31) 4344.61,6229.97 4489.22,6579.09 ccw(c4893,7543.31) 4887.09,6497.97 4887.09,6120.09 cw(c4893,7543.31)
~OUT on Bottom Layer "~OUT_L02_P027" (solid, remove dead copper, pour order 27): 5429.7,6225.15 cw(c4893,7543.31) 4896.94,6120.08 4896.94,6497.96 ccw(c4893,7543.31) 5288.15,6575.52 5429.7,6225.15 cw(c4893,7543.31)
~OUT on Bottom Layer "~OUT_L02_P025" (solid, remove dead copper, pour order 25): 5896.84,6534.4 cw(c4893,7543.31) 5440.66,6229.67 5299.09,6580.06 ccw(c4893,7543.31) 5629.63,6801.6 5896.84,6534.4 cw(c4893,7543.31)
~OUT on Bottom Layer "~OUT_L02_P023" (solid, remove dead copper, pour order 23): 6208.27,6999.56 cw(c4893,7543.31) 5901.63,6539.19 5634.43,6806.39 ccw(c4893,7543.31) 5860.4,7147.22 6208.27,6999.56 cw(c4893,7543.31)
~OUT on Bottom Layer "~OUT_L02_P021" (solid, remove dead copper, pour order 21): 6316.22,7539.37 cw(c4893,7543.31) 6211.37,7007.14 5863.48,7154.81 ccw(c4893,7543.31) 5938.34,7539.37 6316.22,7539.37 cw(c4893,7543.31)
~OUT on Bottom Layer "~OUT_L02_P019" (solid, remove dead copper, pour order 19): 6316.22,7549.21 5938.33,7549.21 ccw(c4893,7543.31) 5858.82,7943.25 6207.93,8087.86 cw(c4893,7543.31)
~OUT on Bottom Layer "~OUT_L02_P017" (solid, remove dead copper, pour order 17): 6205.36,8094.01 5856.25,7949.4 ccw(c4893,7543.31) 5623.84,8290.73 5891.05,8557.94 cw(c4893,7543.31)
~OUT on Bottom Layer "~OUT_L02_P015" (solid, remove dead copper, pour order 15): 5887.2,8561.71 5619.97,8294.48 ccw(c4893,7543.31) 5290.15,8510.27 5434.76,8859.39 cw(c4893,7543.31)
~OUT on Bottom Layer "~OUT_L02_P013" (solid, remove dead copper, pour order 13): 5428.59,8861.91 5283.98,8512.79 ccw(c4893,7543.31) 4898.91,8588.64 4898.91,8966.52 cw(c4893,7543.31)

## Other copper
Top Layer:
  pour cut-out: 9607.57,7543.31 ccw(c4893,7543.31) 4893,12257.87 ccw(c4893,7543.31) 178.43,7543.31 ccw(c4893,7543.31) 4893,2828.74 ccw(c4893,7543.31)
  text "1" at 4616.23,8422.83 h78.74
  text "16" at 5076.07,8402.76 h78.74
  text "2" at 4331.58,8285.83 h78.74
  text "15" at 5329.22,8258.27 h78.74
  text "3" at 4085.52,8020.87 h78.74
  text "14" at 5550.09,8018.5 h78.74
  text "T3_COM_D-1" at 4523.31,7921.65 h78.74
  text "4" at 3966.23,7790.55 h78.74
  text "13" at 5723.31,7756.3 h78.74
  text "5" at 3939.46,7255.51 h78.74
  text "12" at 5674.5,7249.21 h78.74
  text "11" at 5577.25,6998.03 h78.74
  text "6" at 4083.94,6984.65 h78.74
  text "10" at 5321.74,6745.67 h78.74
  text "7" at 4340.24,6735.04 h78.74
  text "9" at 5105.2,6622.44 h78.74
  text "8" at 4605.99,6604.33 h78.74
Bottom Layer:
  pour cut-out: 9599.85,7812.99 9676.46,7812.99 9676.46,8141.73 9569.43,8141.73 ccw(c4893,7543.31) 9164.57,9538.5 9269.88,9587.61 9137.99,9870.44 9023.14,9816.88 ccw(c4893,7543.31) 8051.83,11043.16 8120.43,11124.91 7878.12,11328.23 7810.04,11247.09 ccw(c4893,7543.31) 6442.22,11996.06 6474.6,12085.01 6151.29,12202.68 6112.94,12097.3 ccw(c4893,7543.31) 4589.85,12248.12 4589.85,12299.21 4251.27,12299.21 4251.27,12213.99 ccw(c4893,7543.31) 2846.05,11790.32 2822.06,11846.84 2522.8,11719.81 2557.27,11638.61 ccw(c4893,7543.31) 1370.31,10676.64 1309.32,10731.56 1104.15,10503.69 1173.94,10440.85 ccw(c4893,7543.31) 450.07,9120.48 349.89,9156.94 234.29,8839.32 348.4,8797.79 ccw(c4893,7543.31) 184.06,7312.99 97.72,7312.99 97.72,6980.31 212.17,6980.31 ccw(c4893,7543.31) 646.98,5494.3 555.1,5441.26 725.04,5146.9 805.76,5193.5 ccw(c4893,7543.31) 1784.43,3998.75 1731.73,3923.49 2005.05,3732.11 2043.63,3787.21 ccw(c4893,7543.31) 3362.1,3084.22 3337.36,2991.89 3671.47,2902.36 3693.33,2983.93 ccw(c4893,7543.31) 5111.5,2833.81 5111.5,2759.84 5469.77,2759.84 5469.77,2864.15 ccw(c4893,7543.31) 6943.2,3297.86 6994.49,3209.02 7294.52,3382.24 7249.63,3460 ccw(c4893,7543.31) 8395.4,4387.31 8454.72,4327.99 8681.15,4554.42 8602.29,4633.27 ccw(c4893,7543.31) 9341.84,5982.87 9427.46,5948.28 9544.1,6236.97 9435.4,6280.89 ccw(c4893,7543.31)

## Silkscreen, mask and mechanical layers (free items; w line width, h text height)
Top Overlay:
  text "ANT_CH-16" at 4902.51,12348.51 h59.06 r357
  text "COM_CH-1" at 4367.11,12320.11 h59.06 r2
  text "COM_CH-16" at 6227.13,12153.56 h59.06 r340
  text "ANT_CH-1" at 3088,11983.88 h59.06 r20
  text "ANT_CH-15" at 6754.66,11948.05 h59.06 r335
  text "COM_CH-2" at 2573.47,11751.99 h59.06 r25
  text "COM_CH-15" at 7875.17,11313.9 h59.06 r317
  text "ANT_CH-2" at 1518.75,10955.15 h59.06 r40
  text "ANT_CH-14" at 8295.18,10929.78 h59.06 r312
  text "COM_CH-3" at 1165.72,10577.44 h59.06 r47
  text "COM_CH-14" at 9094.2,9858.9 h59.06 r295
  text "ANT_CH-3" at 468.96,9404.96 h59.06 r65
  text "ANT_CH-13" at 9333.96,9357.36 h59.06 r290
  text "COM_CH-4" at 287.08,8884.92 h59.06 r70
  text "COM_CH-13" at 9653.27,8144 h59.06 r272
  text "ANT_CH-4" at 94.49,7569.74 h59.06 r87
  text "ANT_CH-12" at 9700.17,7503.88 h59.06 r267
  text "COM_CH-5" at 123.63,7060.18 h59.06 r93
  text "COM_CH-12" at 9531.21,6270.99 h59.06 r250
  text "ANT_CH-5" at 455.19,5737.52 h59.06 r110
  text "ANT_CH-11" at 9314.28,5671.81 h59.06 r245
  text "COM_CH-6" at 677.23,5252.52 h59.06 r115
  text "COM_CH-11" at 8663.59,4557.6 h59.06 r227
  text "ANT_CH-6" at 1465.01,4171.42 h59.06 r130
  text "ANT_CH-10" at 8271.97,4125.16 h59.06 r220
  text "COM_CH-7" at 1832.4,3831.92 h59.06 r135
  text "COM_CH-10" at 7241.27,3342.89 h59.06 r205
  text "ANT_CH-7" at 3030.16,3118.88 h59.06 r155
  text "ANT_CH-9" at 6714.53,3095.26 h59.06 r200
  text "COM_CH-8" at 3498.63,2945.65 h59.06 r160
  text "COM_CH-9" at 5368.98,2761.42 h59.06 r180
  text "ANT_CH-8" at 4864.26,2756.3 h59.06 r180
Top Assembly:
  lines w0: 2198.03,7507.87 2333.94,6732.28 ; 4005.2,10066.93 4684.34,10202.76 ; 1461.77,7543.31 ccw(c4893,7543.31) 4893,4112.08 ccw(c4893,7543.31) 8324.23,7543.31 ccw(c4893,7543.31) 4893,10974.54 ccw(c4893,7543.31) 1461.77,7543.31 ; 1644.97,7543.31 ccw(c4893,7543.31) 4893,4295.28 ccw(c4893,7543.31) 8141.03,7543.31 ccw(c4893,7543.31) 4893,10791.34 ccw(c4893,7543.31) 1644.97,7543.31 ; 3003.24,7543.31 ccw(c4893,7543.31) 4893,5653.54 ccw(c4893,7543.31) 6782.76,7543.31 ccw(c4893,7543.31) 4893,9433.07 ccw(c4893,7543.31) 3003.24,7543.31
Bottom Assembly:
  text "L1" at 4196.94,11078.74 h79.92 r280